# Altium PCB Node_gui.PcbDoc
Units mm, origin at the board's own origin, x right, y up, seen from the top; angles counter-clockwise.
Board outline 80 x 75 mm, 2 copper layers (Top Layer, Bottom Layer); 14 components, 10 nets, 65 pads, 0 vias.
Unrouted connection lines stored in the file: 5.
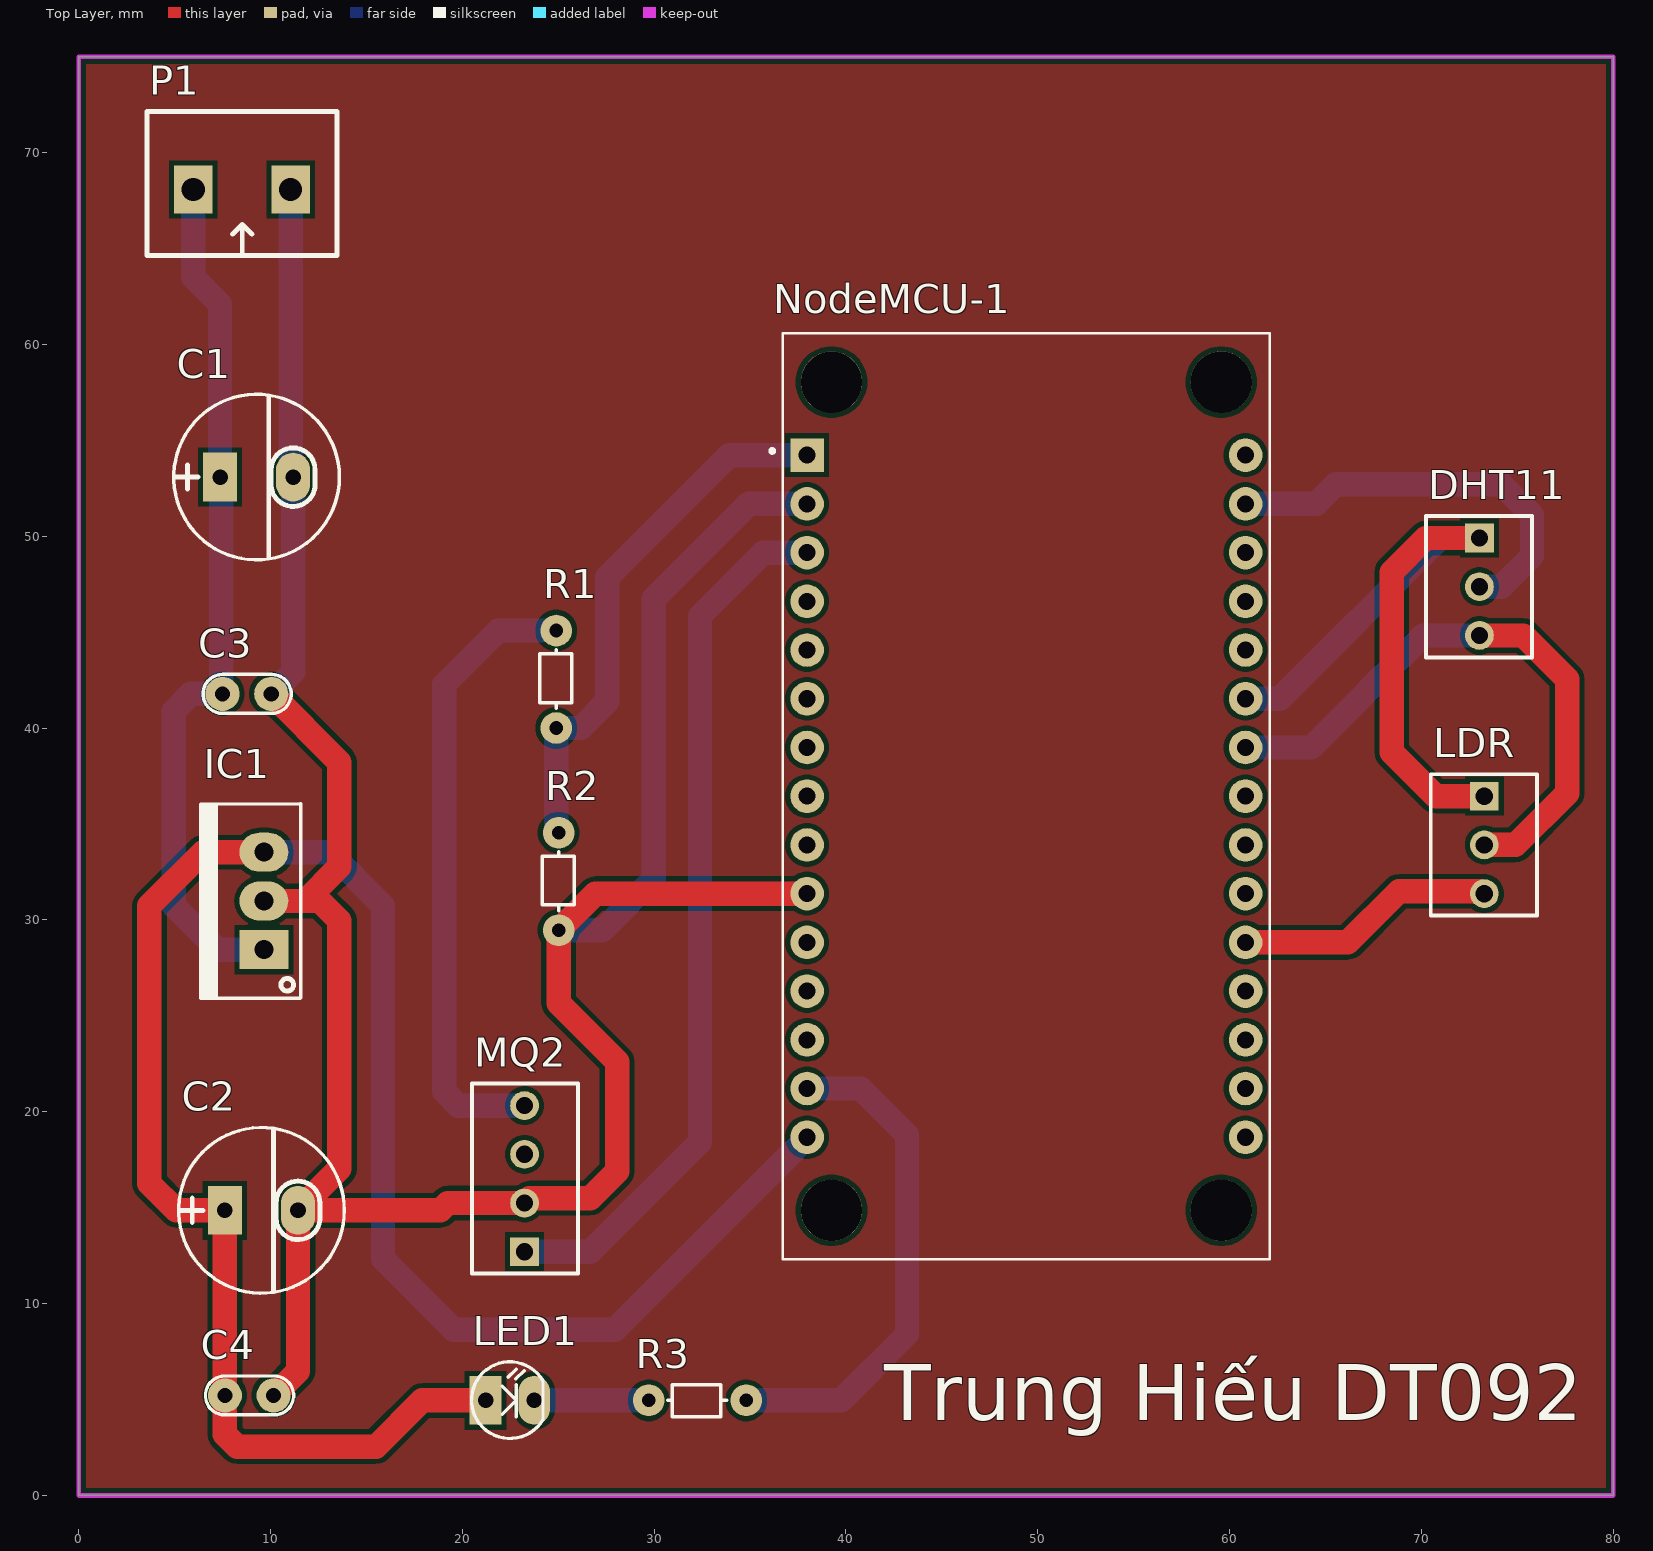
[diagram p0: Top Layer view]
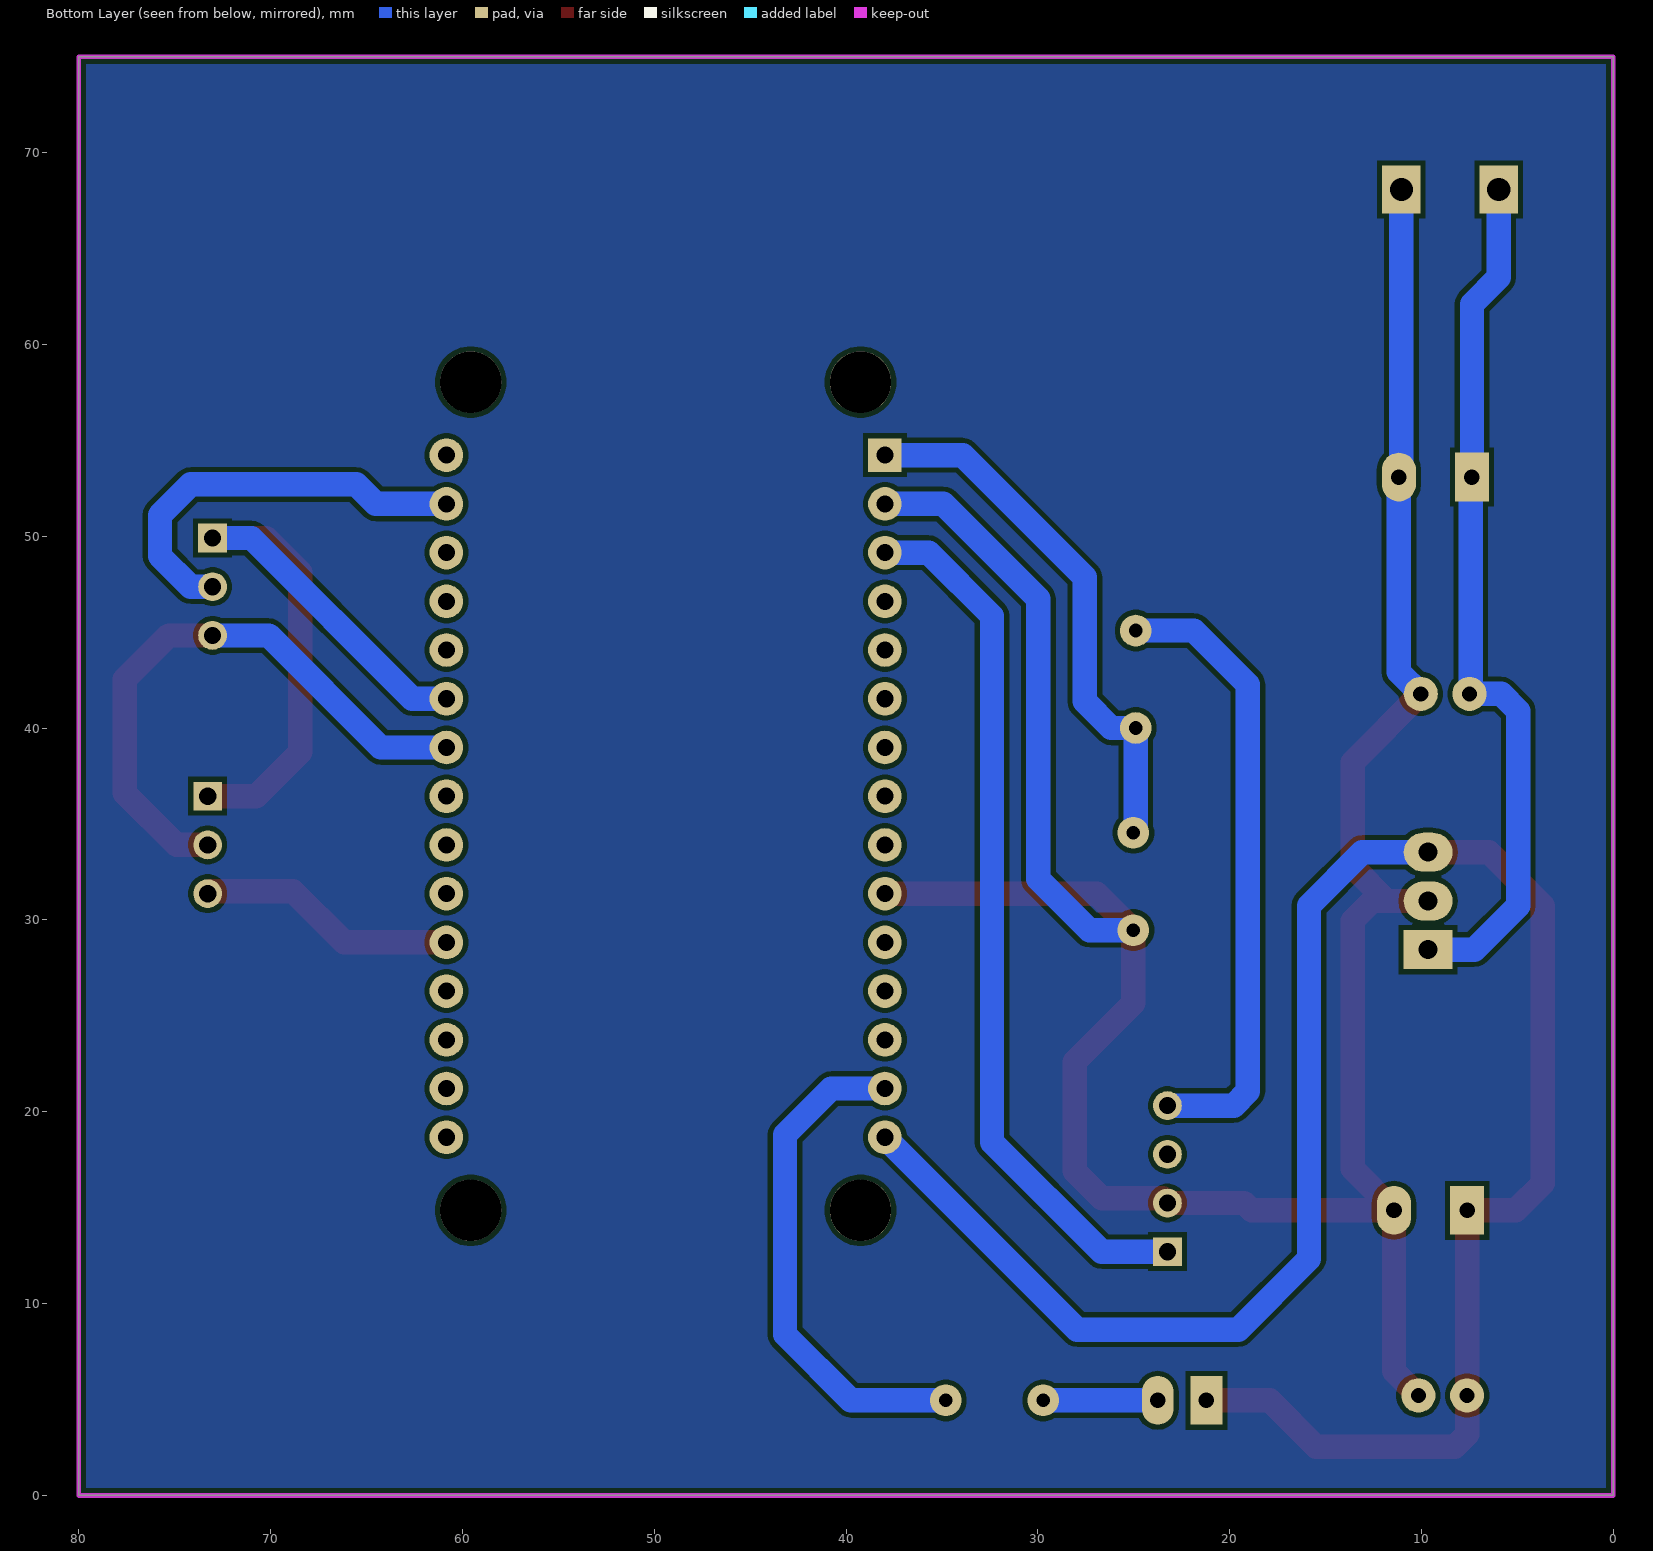
[diagram p1: Bottom Layer view, seen from below]

## Layer stack, top to bottom
Top Solder: solder mask 0.0102, Solder Resist, Dk 3.5
Top Layer: signal copper 0.0356
Dielectric 1: dielectric 0.32, FR-4, Dk 4.8
Bottom Layer: signal copper 0.0356
Bottom Solder: solder mask 0.0102, Solder Resist, Dk 3.5

## Board outline
0,0 0,75 80,75 80,0

## Design rules (kind name [scope] priority, off if disabled: settings)
Clearance [All] p1: gap=0.254 ignorepadtopadclearanceinfootprint=FALSE
PolygonConnect [All] p1: connectstyle=Relief reliefconductorwidth=0.254 reliefentries=4 polygonreliefangle="90 Angle" airgapwidth=0.254
RoutingVias [All] p1: holewidth=0.711 width=1.27 viastyle="Through Hole" minholewidth=0.711 minwidth=1.27 maxholewidth=0.711 maxwidth=1.27
SolderMaskExpansion [All] p1: expansion=0.102 istentingtop=FALSE
SupplyNets "Schematic Supply Nets_2" [InNet('+5')] p1: voltage=0.000
SupplyNets "Schematic Supply Nets_1" [InNet('GND')] p2: voltage=0.000
SupplyNets "Schematic Supply Nets" [InNet('+12')] p3: voltage=0.000
Width [All] p1: maxlimit=2.54 minlimit=0.254 preferedwidth=1.016
30 further rules are at their usual default settings.

## Components (designator, comment, footprint, x,y, rotation, side; value= is the part's Value field where it differs from the comment)
C1 "100uF/25V" CP1.5/3.4 7.366,53.086 r0 top
C2 "47uF/12V" CP1.5/3.4 7.62,14.859 r0 top
C3 "104" CN1 7.493,41.783 r0 top
C4 "104" CN1 7.62,5.207 r0 top
DHT11 "Header3" HDR3 73.025,49.911 r270 top
IC1 "LM7805" QTO-220 9.652,28.448 r90 top
LDR "Header3" HDR3 73.279,36.449 r270 top
LED1 "LED" LED-3 21.209,4.953 r0 top
MQ2 "Header4" HDR4 23.241,12.7 r90 top
NodeMCU-1 "NodeMCU V1.0 ESP-12E" MODULE_ZC563900 49.403,36.449 r0 top
P1 "Header 2 - M" "Medium - Header 2" 8.509,68.072 r180 top
R1 "500" R1/8W 24.892,42.545 r90 top
R2 "1k" R1/8W 25.019,32.004 r90 top
R3 "220" R1/8W 32.258,4.953 r180 top

## Footprints (in the part's own frame and the unit in brackets; to place one, negate y for a bottom-side part, rotate by r counter-clockwise, add the part's x,y. Pads: shape width x height; smd on the part's side, far side on the other; paste and mask are expansions set on the pad)
CN1 [mil]
  round 70 hole 31: 1(0,0) 2(100,0)
  silkscreen extent -40,-40 141,40, body extent -60,-30 170,37, height 265
CP1.5/3.4 [mil] "Tu hoa 220->470uF,16V, 470uF/16V,25V"
  rect 70x100 hole 32: 1(0,0)
  oval 70x100 hole 32: 2(150,0)
  silkscreen extent -95,-170 245,170, body extent -85,-157 230,157, height 446
HDR3 [mm] "Connector; Header; 3 Position"
  rect 1.5x1.5 hole 0.9: 1(0,0)
  round 1.5 hole 0.9: 2(2.54,0) 3(5.08,0)
  silkscreen extent -1.14,-2.79 6.22,2.74, body extent -1.27,-2.92 6.35,2.88, height 11.72
HDR4 [mm] "Connector; Header; 4 Position"
  rect 1.5x1.5 hole 0.9: 1(0,0)
  round 1.5 hole 0.9: 2(2.54,0) 3(5.08,0) 4(7.62,0)
  silkscreen extent -1.14,-2.79 8.76,2.74, body extent -1.27,-2.92 8.89,2.88, height 11.72
LED-3 [mil] "LED 2 PIN, 3ly Only colour"
  rect 65x100 hole 32: 1(0,0)
  oval 65x100 hole 32: 2(100,0)
  silkscreen extent -29,-78 118,79, body extent -13,-75 125,75, height 217
"Medium - Header 2" [mm]
  rect 2x2.5 hole 1.2: 1(-2.54,0) 2(2.54,0)
  silkscreen extent -4.95,-4.08 4.95,3.43, body extent -5,-4.07 5,3.43, height 10
MODULE_ZC563900 [mil]
  round 69 hole 35: 3V3(-450,-300) 3V3(450,-700) 3V3(450,200) D0(450,700) D1(450,600) D2(450,500) D3(450,400) D4(450,300) D5(450,0) D6(450,-100) D7(450,-200) D8(450,-300) EN(-450,-400) GND(-450,-600) GND(-450,-200) GND(-450,600) GND(450,-600) GND(450,100) RST(-450,-500) RX(450,-400) SC(-450,100) SD0(-450,0) SD1(-450,200) SD2(-450,300) SD3(-450,400) SK(-450,-100) TX(450,-500) VIN(-450,-700) VV(-450,500)
  rect 69x69 / inner round 69 / far side rect 69x69 hole 35: A0(-450,700)
  round 125.98 hole 125.98 unplated: ""(-400,-850) ""(-400,850) ""(400,-850) ""(400,850)
  silkscreen extent -526,-950 500,950, body extent -500,-970 500,950, height 276
QTO-220 [mil] "TO-220 - 1-2-3"
  rect 80x100 hole 39: 1(0,0)
  oval 80x100 hole 39: 2(100,0) 3(200,0)
  silkscreen extent -100,-76 300,130, body extent -119,-64 322,121, height 755
R1/8W [mil] "R 1/8W, 2 pin, 300mil"
  round 65 hole 28: 1(-100,0) 2(100,0)
  silkscreen extent -60,-32 61,34, body extent -135,-35 135,37, height 86

## Part data
C1 C2: library part CP3, "Cap 100uF/35V - 470uF/16V"
C3 C4: library part CN1, "Cap np  1pF - 472pF"
DHT11 LDR: "Header IDC, 3 x 1 Pin Vertical 2.54mm Pitch (Non-Boxed, Male)"
IC1: library part LM78xx, "On ap +, from + 5 to + 24VDC"
LED1: "LED Single colour Green and Red"
MQ2: "Header IDC, 4 x 1 Pin Vertical 2.54mm Pitch (Non-Boxed, Male)"
NodeMCU-1: "NodeMCU V1.0 ESP8266 (ESP-12E)"
P1: "Header, 2-Pin, Medium"
R1 R2 R3: library part R, "Resistor 1/4W"

## Nets (pads, with @x,y where several pads share a name; then routed paths per layer and width w, separated by ;. In a path a pad name is that pad's centre, name@x,y a point inside that pad or via, vN(x,y) a via of type N, cw(c..) or ccw(c..) an arc to the next point about the centre after c; other vN are vias at no path point)
+3.3: DHT11.1 LDR.1 NodeMCU-1.3V3 | length 36.1
  Top Layer w1.27: DHT11.1 70.231,49.911 68.453,48.133 68.453,38.735 70.739,36.449 LDR.1
  Bottom Layer w1.27: NodeMCU-1.3V3@60.833,41.529 62.611,41.529 70.993,49.911 DHT11.1
+5: C2.1 C4.1 IC1.3 LED1.1 NodeMCU-1.VIN | length 106.2
  Top Layer w1.27: IC1.3 6.477,33.528 3.683,30.734 3.683,16.256 5.08,14.859 C2.1 C4.1 7.62,3.175 8.255,2.54 15.494,2.54 17.907,4.953 LED1.1
  Bottom Layer w1.27: IC1.3 13.081,33.528 15.862,30.747 15.862,12.332 19.558,8.636 27.94,8.636 NodeMCU-1.VIN
+12: C1.1 C3.1 IC1.1 P1.2 | length 45.6
  Bottom Layer w1.27: P1.2 5.969,63.5 7.366,62.103 C1.1 7.429,53.023 7.429,41.846 C3.1 5.842,41.783 4.953,40.894 4.953,30.734 7.239,28.448 IC1.1
DHT11: DHT11.2 NodeMCU-1.D1 | length 21.6
  Bottom Layer w1.27: NodeMCU-1.D1 64.516,51.689 65.532,52.705 74.168,52.705 75.768,51.105 75.768,48.971 74.168,47.371 DHT11.2
GND: C1.2 C2.2 C3.2 C4.2 DHT11.3 IC1.2 LDR.2 MQ2.2 NodeMCU-1.GND P1.1 R2.1 R3.1 | length 204.1
  Top Layer w1.27: IC1.2 11.811,30.988 ; C3.2 13.589,38.227 13.589,32.766 11.811,30.988 ; C4.2 11.43,6.477 C2.2 ; NodeMCU-1.GND@37.973,31.369 26.924,31.369 R2.1 25.019,25.654 28.067,22.606 28.067,16.891 26.67,15.494 23.495,15.494 MQ2.2 19.24,15.24 18.859,14.859 C2.2 ; DHT11.3 75.311,44.831 77.597,42.545 77.597,36.603 74.903,33.909 LDR.2 ; C2.2 13.589,17.018 13.589,29.972 12.573,30.988 11.811,30.988
  Bottom Layer w1.27: C3.2 11.176,42.926 C1.2 11.049,53.213 P1.1 ; R2.1 27.305,29.464 29.972,32.131 29.972,46.736 34.925,51.689 NodeMCU-1.GND@37.973,51.689 ; R3.1 39.751,4.953 43.18,8.382 43.18,18.796 40.767,21.209 NodeMCU-1.GND@37.973,21.209 ; NodeMCU-1.GND@60.833,38.989 64.258,38.989 70.1,44.831 DHT11.3
LDR: LDR.3 NodeMCU-1.D8 | length 13.6
  Top Layer w1.27: NodeMCU-1.D8 66.167,28.829 68.834,31.496 73.152,31.496 LDR.3
MQ2: MQ2.4 R1.2 | length 32.7
  Bottom Layer w1.27: MQ2.4 19.794,20.32 19.05,21.064 19.05,42.274 21.861,45.085 R1.2
NetLED1_2: LED1.2 R3.2 | length 6
  Bottom Layer w1.27: LED1.2 R3.2
NetNodeMCU-1_A0: NodeMCU-1.A0 R1.1 R2.2 | length 28.3
  Bottom Layer w1.27: R2.2 24.892,34.671 R1.1 26.162,40.005 27.549,41.392 27.549,47.869 33.909,54.229 NodeMCU-1.A0
VV: MQ2.1 NodeMCU-1.VV | length 45.9
  Bottom Layer w1.27: MQ2.1 26.67,12.7 32.385,18.415 32.385,45.847 35.687,49.149 NodeMCU-1.VV
pads on no net: MQ2.3 NodeMCU-1. NodeMCU-1.D0 NodeMCU-1.D2 NodeMCU-1.D3 NodeMCU-1.D4 NodeMCU-1.D5 NodeMCU-1.D6 NodeMCU-1.D7 NodeMCU-1.EN NodeMCU-1.RST NodeMCU-1.RX NodeMCU-1.SC NodeMCU-1.SD0 NodeMCU-1.SD1 NodeMCU-1.SD2 NodeMCU-1.SD3 NodeMCU-1.SK NodeMCU-1.TX

## Polygon pours and split planes (outlines as drawn)
no net on Bottom Layer "Bottom Layer-No Net" (solid, pour order 2): 0,0 80,0 80,75 0,75
no net on Top Layer "Top Layer-No Net" (solid, pour order 0): 0,0 80,0 80,75 0,75

## Keep-outs
Keep-Out Layer:
  the board outline again, w0.254

## Silkscreen, mask and mechanical layers (free items; w line width, h text height)
Top Overlay:
  text "Trung Hiếu DT092" at 42,2.939 h5